# Altium PCB BLV.PcbDoc
Units mil, origin at the board's own origin, x right, y up, seen from the top; angles counter-clockwise.
Board outline 1968.5 x 1704.77 mil, 2 copper layers (Top Layer, Bottom Layer); 33 components, 31 nets, 109 pads, 102 vias.
Unrouted connection lines stored in the file: 28.
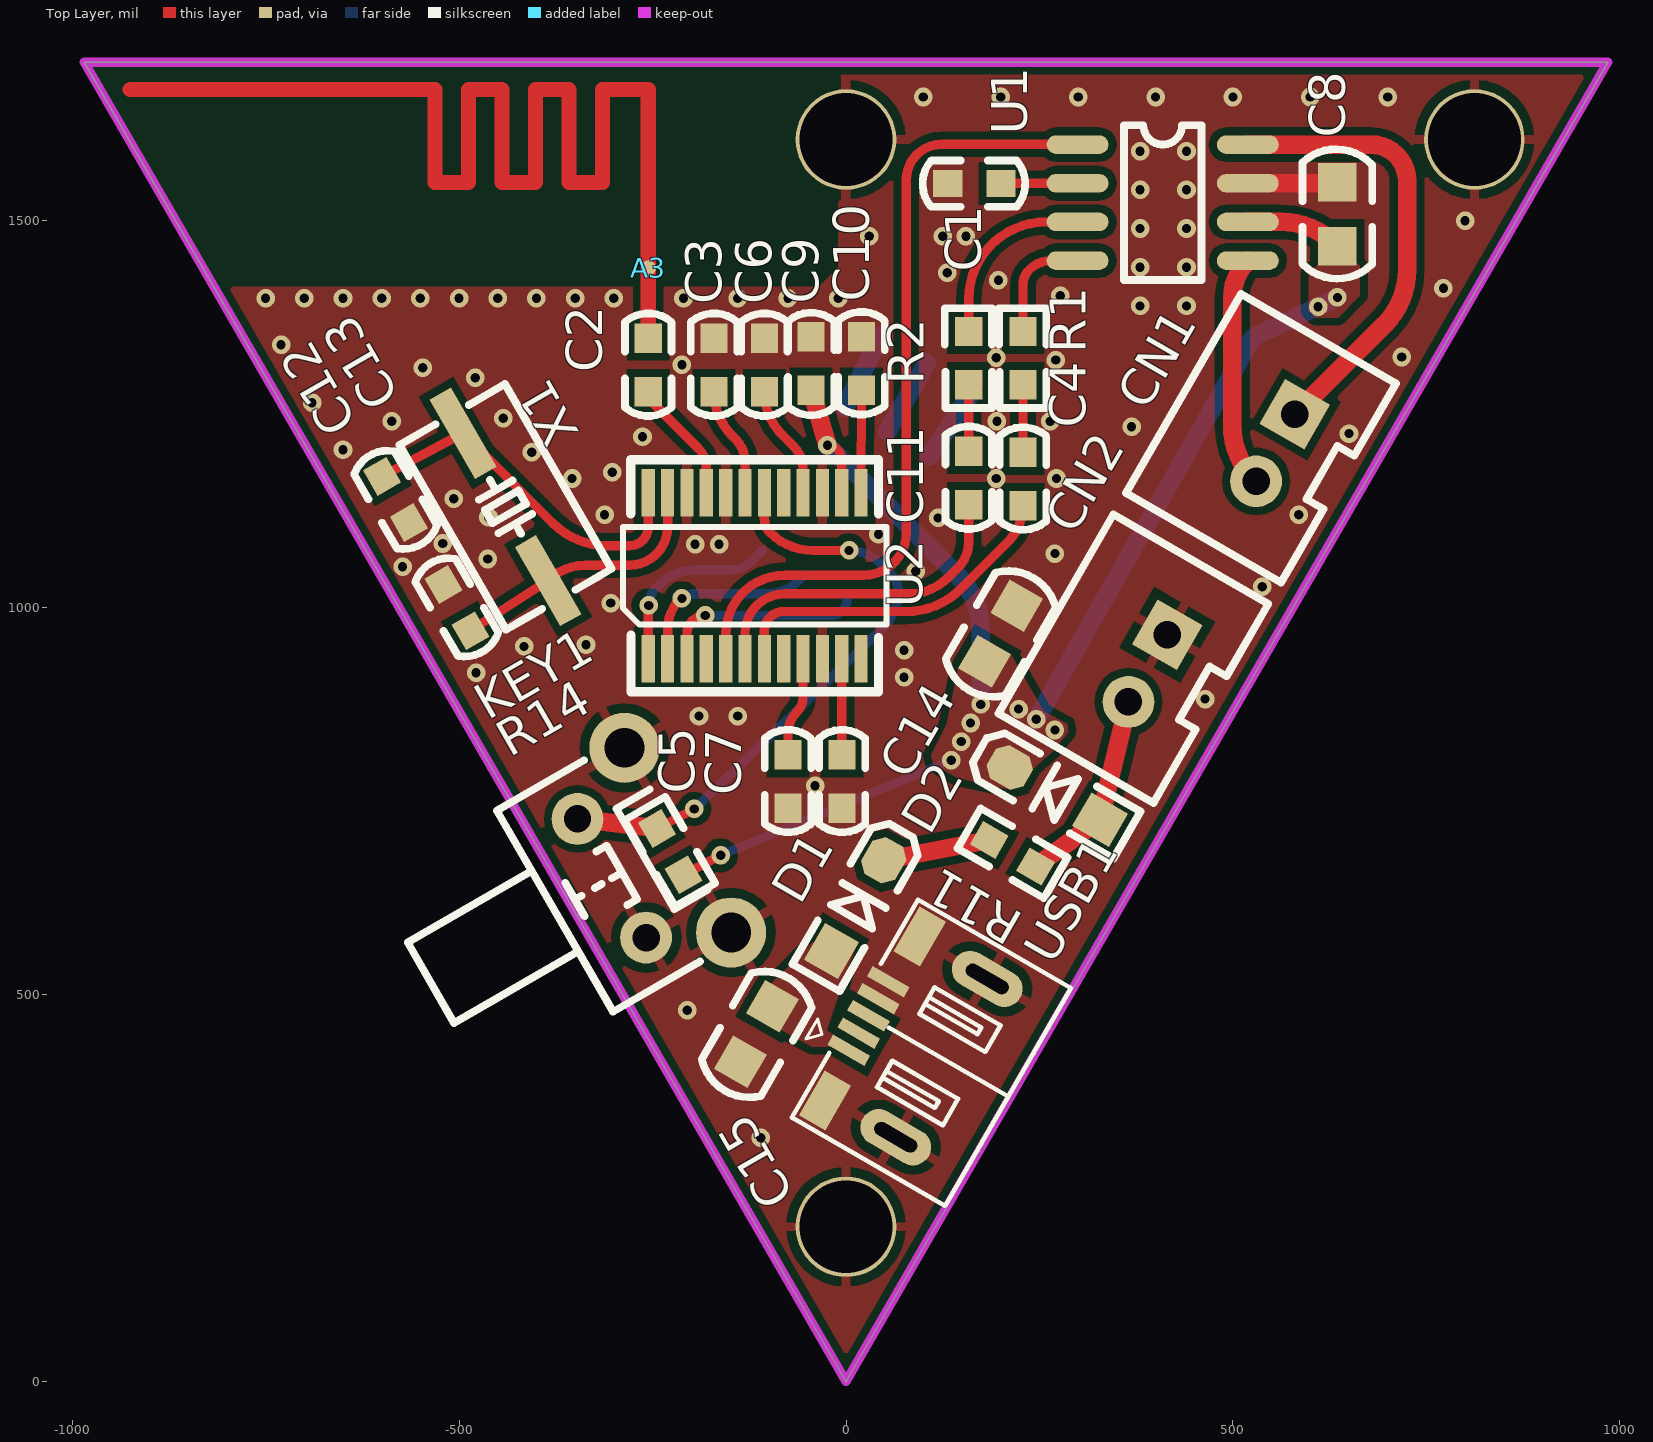
[diagram p0: Top Layer view]
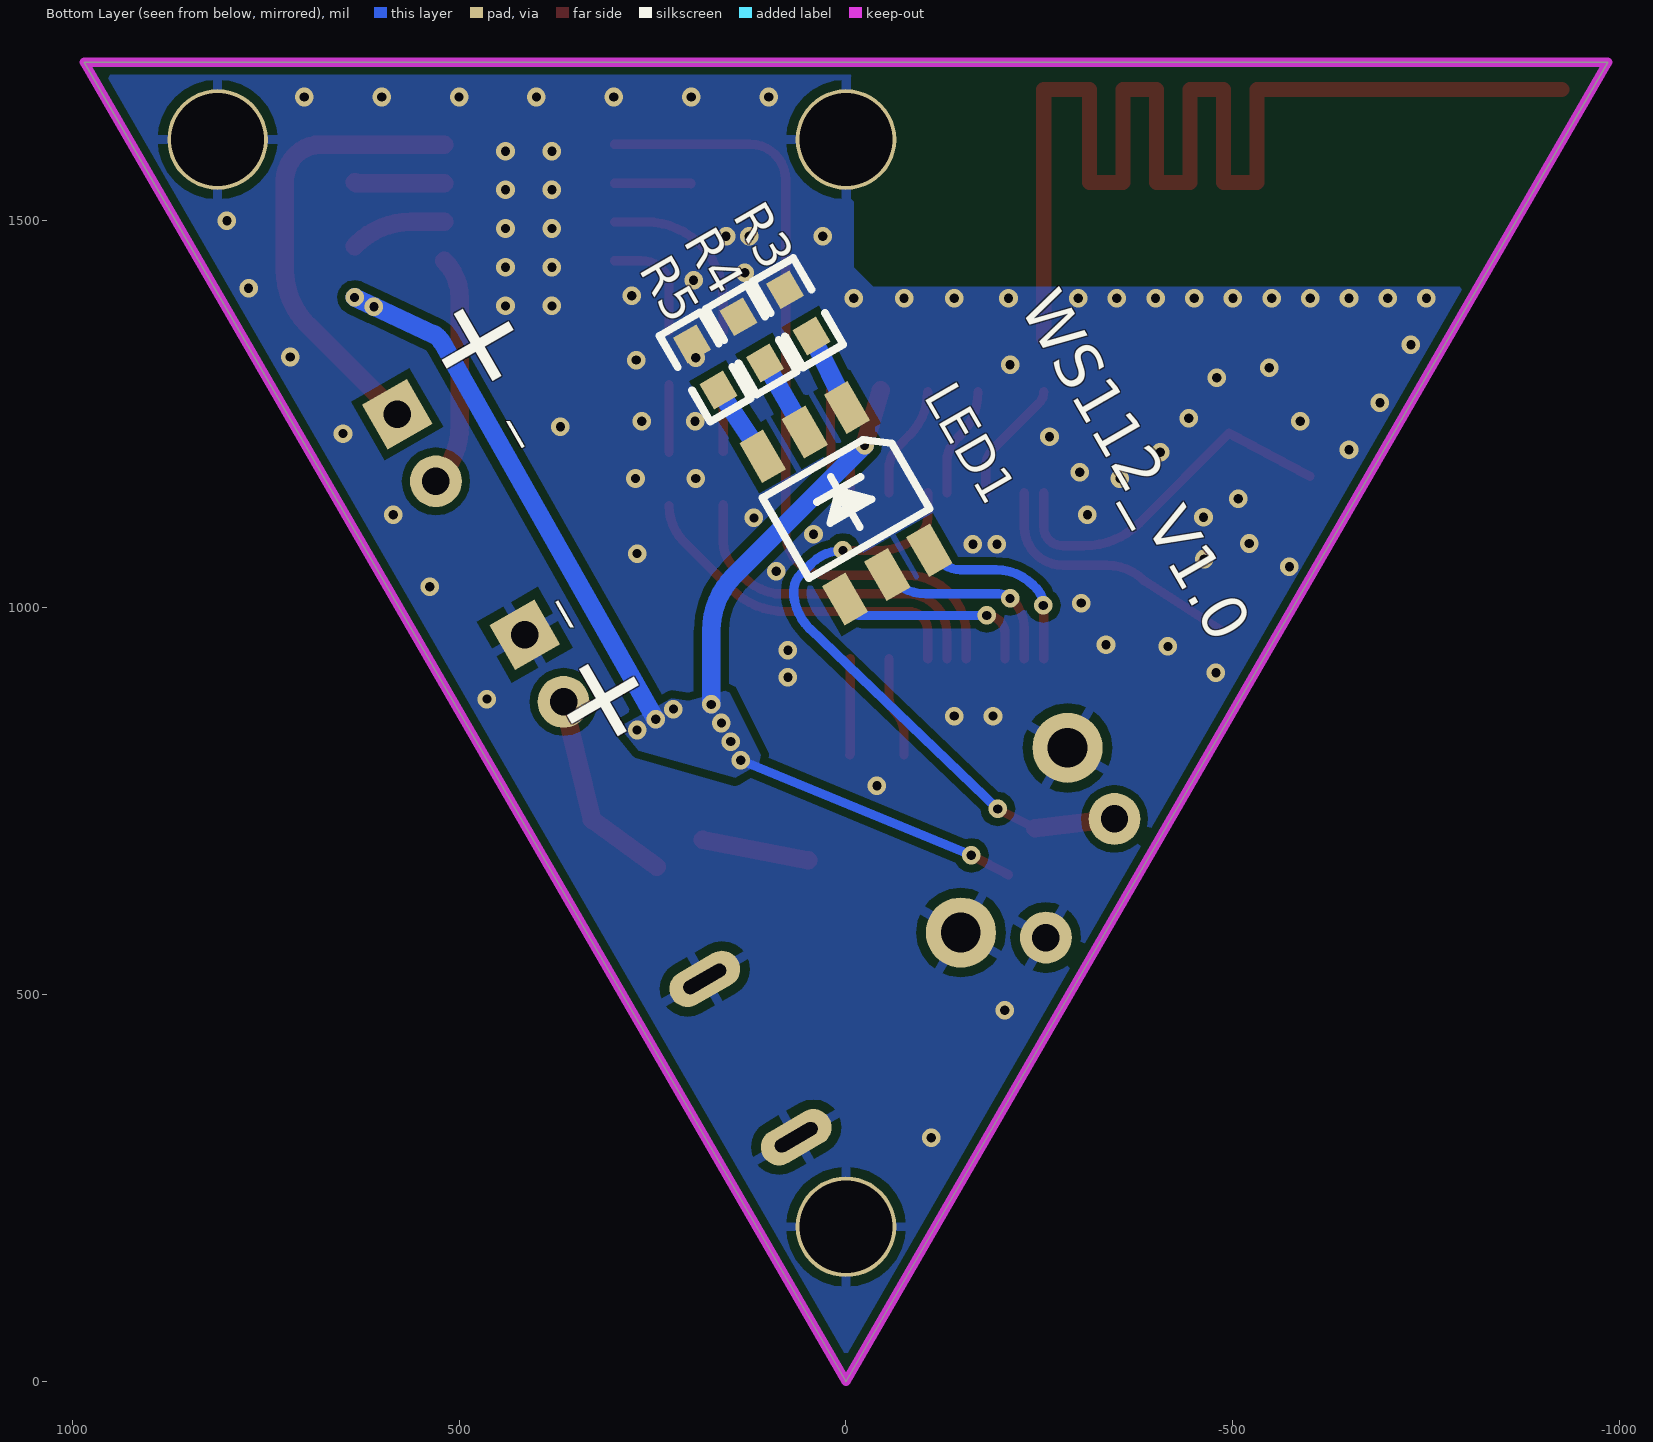
[diagram p1: Bottom Layer view, seen from below]
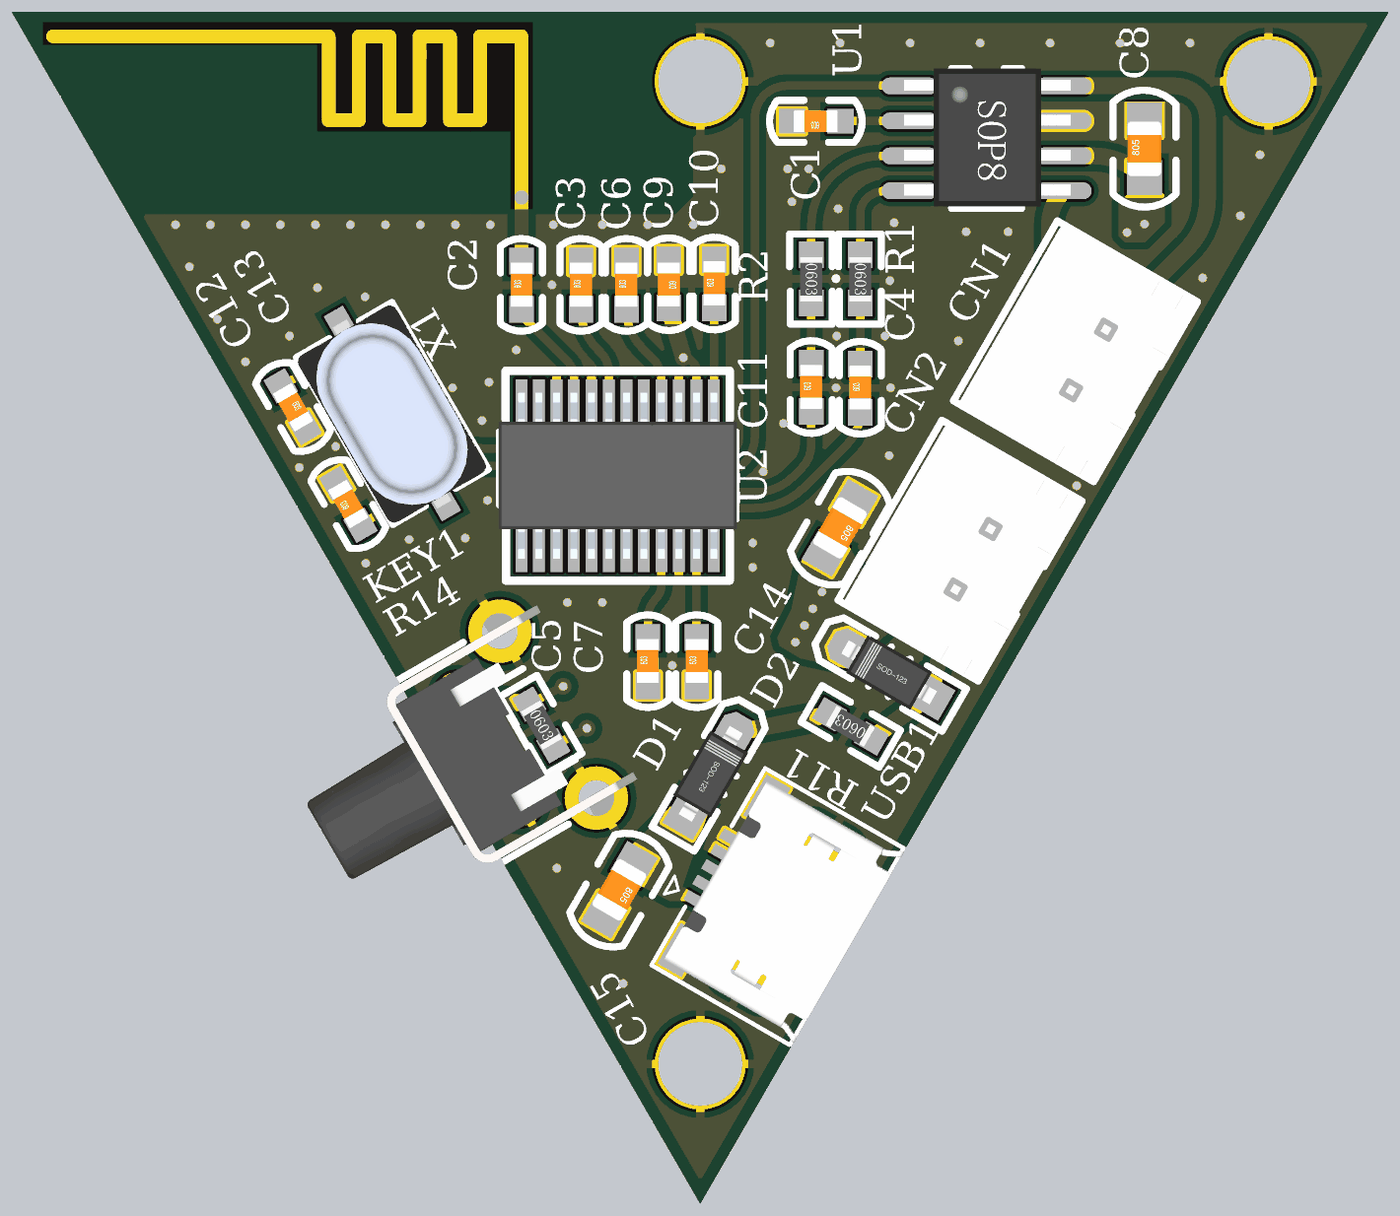
[diagram p2: 3D render of the assembled board from above, using the file's embedded part models]
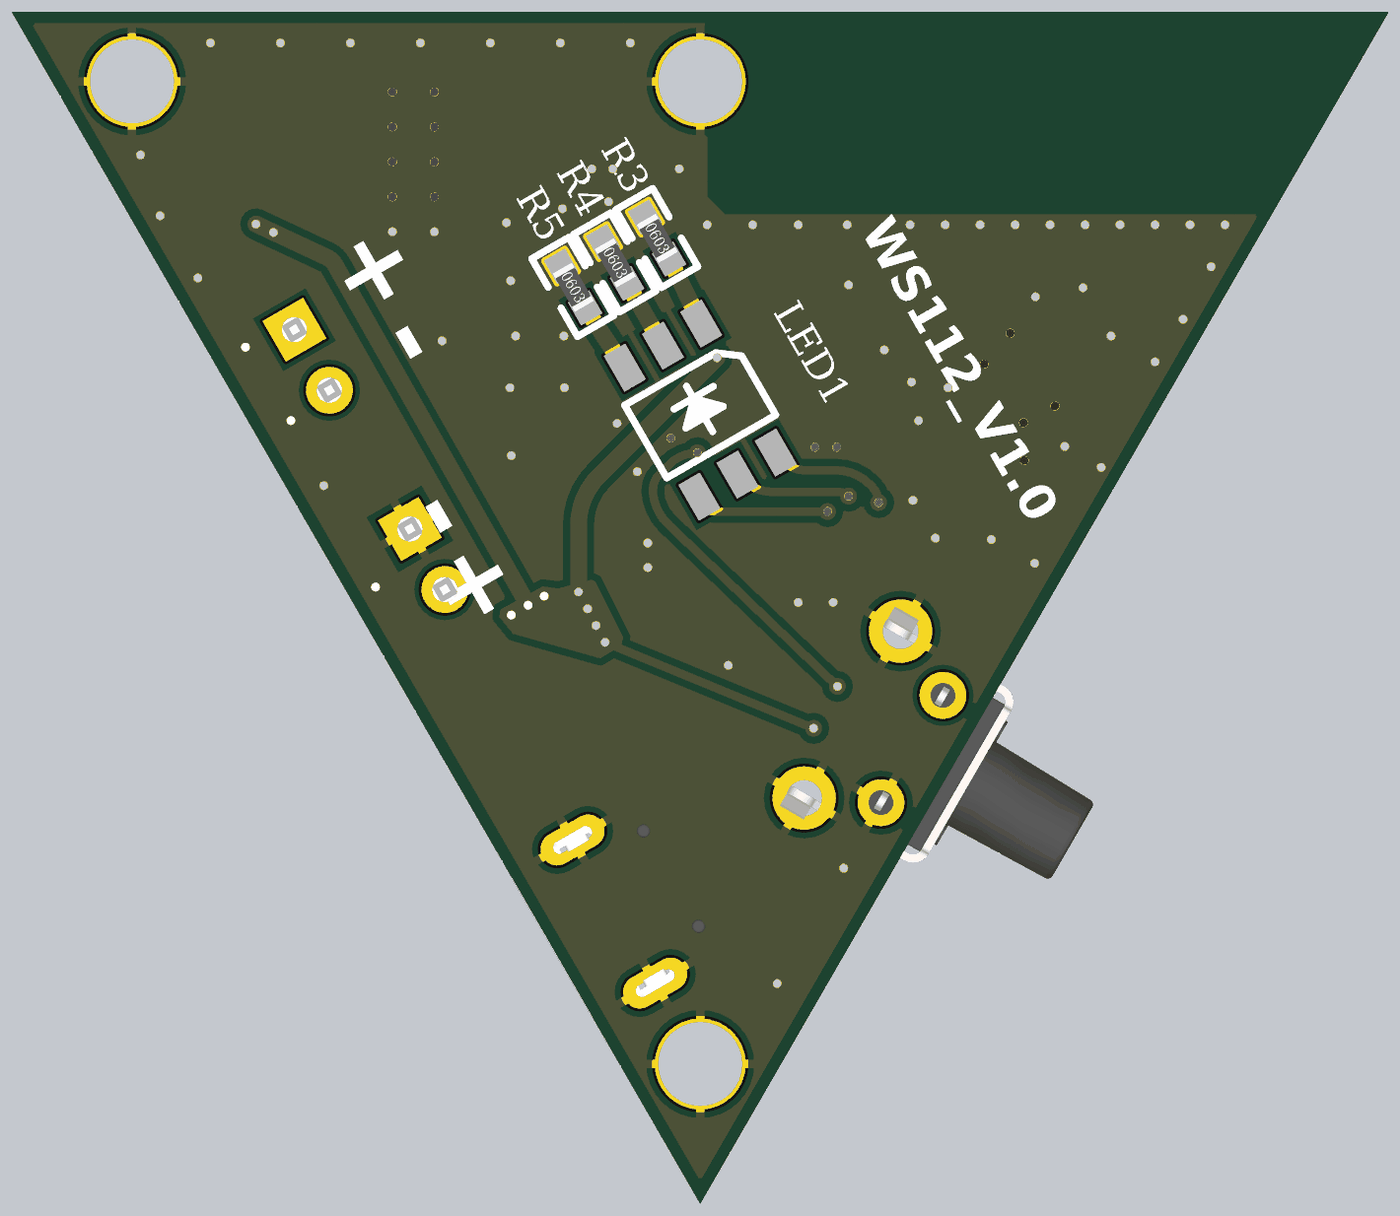
[diagram p3: 3D render of the assembled board from below, using the file's embedded part models]

## Layer stack, top to bottom
Top Solder: solder mask 0.4, Solder Resist, Dk 3.5
Top Layer: signal copper 1.4
Dielectric 1: dielectric 12.6, FR-4, Dk 4.8
Bottom Layer: signal copper 1.4
Bottom Solder: solder mask 0.4, Solder Resist, Dk 3.5

## Board outline
-984.25,1704.77 984.25,1704.77 0,0

## Design rules (kind name [scope] priority, off if disabled: settings)
AssemblyTestPointUsage [All] p1 off:
AssemblyTestpoint [All] p1 off: testpointundercomponent=TRUE minsize=40 maxsize=100 preferedsize=60 minholesize=0 maxholesize=40 preferedholesize=32 testpointgrid=1 usegrid=TRUE gridtolerance=0.01 allowsidetop=TRUE allowsidebottom=TRUE
Clearance [All] p1: gap=10 ignorepadtopadclearanceinfootprint=TRUE except(0: Arc-Text Arc-Hole Track-Text Track-Hole SMDPad-Text SMDPad-Hole THPad-Text THPad-Hole Via-Text Via-Hole Fill-Text Fill-Hole Poly-Text Poly-Hole Region-Text Region-Hole Text-Text Text-Hole)
FabricationTestPointUsage [All] p1 off: valid=0 allowmultiple=FALSE
FabricationTestpoint [All] p1 off: side=3 testpointundercomponent=TRUE minsize=40 maxsize=100 preferedsize=60 minholesize=0 maxholesize=40 preferedholesize=32 testpointgrid=1 allowsidetop=TRUE allowsidebottom=TRUE usegrid=TRUE gridtolerance=0.01
HoleSize [All] p1: absolutevalues=TRUE maxlimit=10000 minlimit=1 maxpercent=80.000 minpercent=20.000
LayerPairs [All] p1 off: enforce=TRUE
MinimumSolderMaskSliver [All] p1 off: minsoldermaskwidth=10
PasteMaskExpansion [All] p1 off: expansion=0
PlaneConnect [All] p1: pad.planeconnectstyle=Relief pad.reliefexpansion=20 pad.reliefentries=4 pad.reliefconductorwidth=10 pad.reliefairgap=10 via.planeconnectstyle=Direct via.reliefexpansion=20 via.reliefentries=4 via.reliefconductorwidth=10 via.reliefairgap=10
PolygonConnect [All] p1: thpad.connectstyle=Relief thpad.reliefconductorwidth=12 thpad.reliefentries=4 thpad.polygonreliefangle="90 Angle" thpad.airgapwidth=12 smdpad.connectstyle=Direct smdpad.reliefconductorwidth=10 smdpad.reliefentries=4 smdpad.polygonreliefangle="90 Angle" smdpad.airgapwidth=10 via.connectstyle=Direct via.reliefconductorwidth=10 via.reliefentries=4 via.polygonreliefangle="90 Angle" via.airgapwidth=10
RoutingVias [All] p1: holewidth=12 width=24 viastyle="Through Hole" minholewidth=8 minwidth=12 maxholewidth=24 maxwidth=48
SilkToSilkClearance [All] p1 off: silktosilkclearance=6
SilkToSolderMaskClearance [IsPad] p1 off: minsilkscreentomaskgap=10 clearancetoexposedcopper=TRUE
SolderMaskExpansion [All] p1 off: expansion=4 istentingtop=FALSE
Width [All] p1: maxlimit=300 minlimit=10 preferedwidth=12
19 further rules are at their usual default settings.

## Components (designator, comment, footprint, x,y, rotation, side; value= is the part's Value field where it differs from the comment)
A3 "2.4G天线" ANT-RF-BT6-2.4G -255.51,1439.06 r180 top
C1 "1u" C0603 200.25,1548.02 r180 top
C2 "10p" C0603 -255.51,1279.06 r90 top
C3 "1u" C0603 -170.51,1279.06 r90 top
C4 "10n" C0603 228.65,1131.99 r90 top
C5 "1u" C0603 -75,741 r90 top
C6 "1u" C0603 -105.51,1279.06 r90 top
C7 "560n" C0603 -5,741 r90 top
C8 "10u" C0805 634.9,1461.3 r90 top
C9 "10u" C0603 -45,1350 r270 top
C10 "10u" C0603 20,1281 r90 top
C11 "10n" C0603 158.65,1132.99 r90 top
C12 "10p" C0603 -485.5,970.24 r120 top
C13 "10p" C0603 -599.5,1169.76 r300 top
C14 "100n" C0805 223.44,1007.77 r240 top
C15 "10u" C0805 -92,490.2 r240 top
CN1 "XH2.54" XH2.54-LI-2P 555,1206.7 r240 top
CN2 "XH2.54" XH2.54-LI-2P 390,921.7 r240 top
D1 "T4" SOD-123 15,615 r60 top
D2 "S4" SOD-123 270,760 r150 top
KEY1 "DIP 6*6*8" "TSW DIP-6*6*8" -260,675 r120 top
LED1 "RGB" "LED 5050" 0,1135 r240 bottom
R1 "47k" R0603 228.65,1356.99 r270 top
R2 "47k" R0603 158.65,1356.99 r270 top
R3 "5k1" R0603 79,1411 r240 bottom
R4 "5k1" R0603 139,1376 r240 bottom
R5 "5k1" R0603 199,1341 r240 bottom
R11 "150" R0603 244.76,665.5 r150 top
R14 "47k" R0603 -244.5,714.76 r300 top
U1 "ANT8110S" SOP8 300.28,1599.53 r0 top
U2 "AS1711-5C4" QSOP24 -117.99,1041.34 r90 top
USB1 "U254-051T-4BH82-S2S" USB-MICRO_B 120,420 r60 top
X1 "24MHz" 49XSMD -495,1225.53 r300 top

## Footprints (in the part's own frame and the unit in brackets; to place one, negate y for a bottom-side part, rotate by r counter-clockwise, add the part's x,y. Pads: shape width x height; smd on the part's side, far side on the other; paste and mask are expansions set on the pad)
49XSMD [mm]
  rect 3x0.8 smd: 1(0,0) 2(5.588,0)
  silkscreen extent -0.71,-2 6.29,2, body extent -0.99,-2.07 6.61,2.03, height 2.31
ANT-RF-BT6-2.4G [mil]
  round 20 smd: 1(0,0)
  Top Layer lines w19.68: 669.29,-230.46 275.59,-230.46 275.59,-110.38 232.28,-110.38 232.28,-230.46 188.98,-230.46 188.98,-110.38 145.67,-110.38 145.67,-230.46 102.36,-230.46 102.36,-110.38 59.05,-110.38 59.06,-230.46 0,-230.46 0,0
C0603 [mil]
  rect 38x35 smd: 1(0,0) 2(69,0)
  silkscreen extent -31,-30 101,30, body extent 4,-16 67,16, height 12
C0805 [mil]
  rect 50x50 smd: 1(6,0) 2(88.7,-0.1)
  silkscreen extent -36,-45 131,45, body extent 8,-25 87,25, height 30
"LED 5050" [mm] "白色5050LED                                           淘宝ID:黄晶宝石"
  rect 1.5x0.9 smd: 1(-2.705,-1.6) 2(-2.705,0) 3(-2.705,1.6) 4(2.705,1.6) 5(2.705,0) 6(2.705,-1.6)
  silkscreen extent -1.52,-2.29 1.52,2.29, body extent -2.7,-2.5 2.7,2.5, height 1.65
QSOP24 [mm]
  rect 1.55x0.435 smd: 1(-2.725,3.492) 2(-2.725,2.858) 3(-2.725,2.222) 4(-2.725,1.588) 5(-2.725,0.952) 6(-2.725,0.318) 7(-2.725,-0.318) 8(-2.725,-0.952) 9(-2.725,-1.588) 10(-2.725,-2.222) 11(-2.725,-2.858) 12(-2.725,-3.492) 13(2.725,-3.492) 14(2.725,-2.858) 15(2.725,-2.222) 16(2.725,-1.588) 17(2.725,-0.952) 18(2.725,-0.318) 19(2.725,0.318) 20(2.725,0.952) 21(2.725,1.588) 22(2.725,2.222) 23(2.725,2.858) 24(2.725,3.492)
  silkscreen extent -3.81,-4.33 3.81,4.33, body extent -3.01,-4.33 3.01,4.32, height 1.75
R0603 [mil] "1/10W"
  rect 38x35 smd: 1(0,0) 2(69,0)
  silkscreen extent -30,-31 99,30, body extent 4,-16 66,16, height 18
SOD-123 [mil] "2.7x1.6X1.1mm（长宽高，不包括引脚）"
  oct 55x50 smd: 1(67.5,0)
  rect 55x50 smd: 2(-67.5,0)
  silkscreen extent -107,-35 112,35, body extent -73,-31 73,31, height 48
SOP8 [mil]
  oval 80x24 smd: 1(-1,-1) 2(-1,-51) 3(-1,-101) 4(-1,-151) 5(219,-151) 6(219,-101) 7(219,-51) 8(219,-1)
  silkscreen extent 59,-176 159,24, body extent -9,-174 229,24, height 63
"TSW DIP-6*6*8" [mm] "6*6*6mm"
  round 1.7 hole 0.9: 1(2.25,1.25) 2(-2.25,1.25)
  round 2.3 hole 1.3: 3(-3.5,-1.25) 4(3.5,-1.25)
  silkscreen extent -3.81,-1.29 3.81,8.11, body extent -4.18,-2.88 4.18,7.97, height 7.48
USB-MICRO_B [mm] "micro型USB ，5.9*8.2*2.5mm"
  rect 0.394x1.4 smd: 1(-1.295,2.667) 4(0.648,2.667) 5(1.295,2.667)
  rect 0.394x1.4 smd mask+0.102: 2(-0.648,2.667) 3(0,2.667)
  rect 1.7x1 smd: 6(3.099,2.515) 9(-3.124,2.515)
  oval 1.2x2.5 hole 0.45 slot 1.55 at 90 deg: 7(3,-0.1) 8(-3,-0.1)
  silkscreen extent -4.14,-2.63 4.11,4.06, body extent -4,-2.72 4,2.88, height 2.8
XH2.54-LI-2P [mm] "接插件，2P"
  rect 1.7x1.7 hole 0.9: 1(-1.27,0)
  round 1.7 hole 0.9: 2(1.27,0)
  silkscreen extent -3.81,-3.51 3.74,2.37, body extent -3.77,-3.3 3.77,2.4, height 7.05

## Part data
A3: BOM_Manufacturer Part="New SchematicLib", Contributor=suanm, spicePre=U, spiceSymbolName=2.4G天线_右
C4 C11: library part 22n, Contributor=LCEDA_Lib, nameAlias=Value(F), spicePre=C, spiceSymbolName=C_0603_US
CN1 CN2: BOM_JLCPCB Part Class="Extended Part", BOM_Manufacturer=null, BOM_Manufacturer Part=CONN-TH_XH-2A, BOM_Supplier=LCSC, BOM_Supplier Part=C9900010848, Contributor=LCSC, spicePre=C, spiceSymbolName=CONN-TH_XH-2A_C9900010848
D1 D2: BOM_JLCPCB Part Class="Extended Part", BOM_Manufacturer=CJ, BOM_Manufacturer Part="1N4148W T4", BOM_Supplier=LCSC, BOM_Supplier Part=C2099, Contributor=立创EDA官方封装库, spicePre=D, spiceSymbolName="1N4148W T4"
KEY1: BOM_JLCPCB Part Class="Extended Part", BOM_Manufacturer=韩国韩荣, BOM_Manufacturer Part=K2-1102AQ-H4CW-01, BOM_Supplier=LCSC, BOM_Supplier Part=C961738, Contributor=LCSC, spicePre=S, spiceSymbolName=K2-1102AQ-H4CW-01
LED1: BOM_JLCPCB Part Class="Extended Part", BOM_Manufacturer="Hongli Zhihui (HONGLITRONIC)", BOM_Manufacturer Part=HL-AF-5060H271BU46FU79GC-S1-THL, BOM_Supplier=LCSC, BOM_Supplier Part=C219409, Contributor=LCSC, spicePre=L, spiceSymbolName=HL-AF-5060H271BU46FU79GC-S1-THL
R1 R2: library part 22k, Contributor=LCEDA_Lib, nameAlias=Value(Ω), spicePre=R, spiceSymbolName=R_0603_EU
R14: library part 4k7, Contributor=LCEDA_Lib, nameAlias=Value(Ω), spicePre=R, spiceSymbolName=R_0603_EU
U1: BOM_JLCPCB Part Class="Extended Part", BOM_Manufacturer=null, BOM_Manufacturer Part=ANT8110S, BOM_Supplier=LCSC, BOM_Supplier Part=C9900000568, Contributor=LCSC, spicePre=U, spiceSymbolName=ANT8110S
USB1: BOM_JLCPCB Part Class="Extended Part", BOM_Manufacturer="XKB Connectivity(中国星坤)", BOM_Manufacturer Part=U254-051T-4BH82-S2S, BOM_Supplier=LCSC, BOM_Supplier Part=C908456, Contributor=LCSC, spicePre=U, spiceSymbolName=U254-051T-4BH82-S2S
X1: BOM_JLCPCB Part Class="Extended Part", BOM_Manufacturer="Yangxing Tech", BOM_Manufacturer Part=X49XM24MOB2SC, BOM_Supplier=LCSC, BOM_Supplier Part=C412889, Contributor=LCSC, nameAlias=Frequency, spicePre=X, spiceSymbolName=X49XM24MOB2SC
C1 C8 C14 C15: Contributor=LCEDA_Lib, nameAlias=Value(F), spicePre=C, spiceSymbolName=C_0805_US
C2 C3 C5 C6 C7 C9 C10 C12 C13: Contributor=LCEDA_Lib, nameAlias=Value(F), spicePre=C, spiceSymbolName=C_0603_US
R3 R4 R5 R11: Contributor=LCEDA_Lib, nameAlias=Value(Ω), spicePre=R, spiceSymbolName=R_0603_EU
U2: BOM_Supplier=JL杰理, Contributor=lekee085, spicePre=U, spiceSymbolName=AS1711-5C4

## Free pads (board coordinates)
  round 130 hole 120: 0(0,200) 0(0,1605) 0(812,1605)

## Via types
v1: diameter 24, hole 12, Top Layer to Bottom Layer, tented both sides, 102 vias

## Nets (pads, with @x,y where several pads share a name; then routed paths per layer and width w, separated by ;. In a path a pad name is that pad's centre, name@x,y a point inside that pad or via, vN(x,y) a via of type N, cw(c..) or ccw(c..) an arc to the next point about the centre after c; other vN are vias at no path point)
3.3V: C8.1 C9.2 C14.2 D2.1 R14.2 U1.6 U2.14 | length 1747.2
  Top Layer w12: R14.2 v1(-162,680) ; v1(-24,1210) cw(c-24,1191.47) -5.47,1191.47 U2.14
  Top Layer w24: C9.2 v1(-24,1210) ; U1.6 562.25,1498.53 cw(c562.25,1398.53) 632.96,1469.24 C8.1
  Bottom Layer w12: v1(-162,680) v1(136,803)
  Bottom Layer w24: v1(-24,1210) 144.71,1041.29 cw(c74,970.58) 174,970.58 v1(174,875) ; v1(246,856) 522.23,1343.34 cw(c543.1,1331.51) 532.96,1353.26 609.88,1389.25 v1(635,1401)
  other v1: 149,827 270,842 161,851 223,869 610,1389
GND: C1.2 C3.2 C5.1 C6.2 C7.1 C8.2 C9.1 C10.2 C12.2 C13.2 C14.1 C15.2 CN2.1 KEY1.2 KEY1.3 KEY1.4 pad.0 R3.1 R4.1 R5.1 U1.7 U2.10 U2.15 U2.20 U2.22 USB1.4 USB1.5 USB1.6 USB1.7 USB1.8 USB1.9 | length 116.1
  Top Layer w24: U1.7 631.46,1548.53 ccw(c631.46,1553.54) C8.2
  other v1: -110,315 -205,480 -40,770 -190,860 -140,860 464,882 75,910 -478,916 75,945 -416,950 -336,952 -304,1006 538,1027 90,1047 -573,1053 -463,1063 270,1070 -195,1082 -164,1082 -521,1083 42,1095 119,1116 -462,1117 -312,1120 585,1120 -507,1141 -354,1167 194,1167 272,1167 -302,1175 -406,1201 -650,1204 -263,1221 650,1225 369,1234 -587,1241 195,1241 264,1241 -443,1245 -690,1265 -479,1297 -547,1310 -212,1314 271,1320 194,1323 718,1324 -730,1340 380,1390 440,1390 -750,1400 -700,1400 -650,1400 -600,1400 -550,1400 -500,1400 -450,1400 -400,1400 -350,1400 -300,1400 -210,1400 -140,1400 -75,1400 -10,1400 277,1403 772,1413 197,1423 131,1433 380,1440 440,1440 30,1480 125,1480 155,1480 380,1490 440,1490 800,1500 380,1540 440,1540 380,1590 440,1590 100,1660 200,1660 300,1660 400,1660 500,1660 600,1660 700,1660
NetA3_1: A3.1 C2.2 | length 91
  Top Layer w19.68: C2.2 A3.1
NetC1_1: C1.1 U1.2 | length 99.2
  Top Layer w12: C1.1 cw(c201.48,1546.79) 201.48,1548.53 U1.2
NetC2_1: C2.1 U2.21 | length 159.2
  Top Layer w12: C2.1 ccw(c-234.86,1279.06) -249.46,1264.46 -190,1205 cw(c-212.92,1182.08) -180.51,1182.08 U2.21
NetC3_1: C3.1 U2.19 | length 141.8
  Top Layer w12: C3.1 ccw(c-89.5,1279.06) -146.78,1221.78 -142,1217 cw(c-169.75,1189.25) -130.51,1189.25 U2.19
NetC4_1: C4.1 U2.7 | length 450.2
  Top Layer w12: U2.7 -105.47,970.53 cw(c-81,970.53) -81,995 77.58,995 ccw(c77.58,1095) 148.29,1024.29 209.31,1085.31 ccw(c162.63,1131.99) C4.1
NetC4_2: C4.2 R1.2 | length 87
  Top Layer w12: C4.2 R1.2
NetC5_2: C5.2 U2.9 | length 129.3
  Top Layer w12: C5.2 -75,837.03 cw(c-34.03,837.03) -63,866 ccw(c-81.19,884.19) -55.47,884.19 U2.9
NetC6_1: C6.1 U2.16 | length 145.9
  Top Layer w12: C6.1 ccw(c-26.92,1279.06) -82.49,1223.49 -68,1209 cw(c-98.26,1178.74) -55.47,1178.74 U2.16
NetC7_2: C7.2 U2.11 | length 124.2
  Top Layer w12: U2.11 -5.47,811.12 ccw(c-3.88,811.12) C7.2
NetC10_1: C10.1 U2.13 | length 132.4
  Top Layer w12: U2.13 C10.1
NetC11_1: C11.1 U2.6 | length 433
  Top Layer w12: U2.6 -130.51,966.49 cw(c-79,966.49) -79,1018 89.02,1018 ccw(c89.02,1030) 91.05,1018.17 ccw(c77.58,1095) 132.71,1039.83 144.94,1052.06 ccw(c111.85,1085.15) 158.65,1085.15 C11.1
NetC11_2: C11.2 R2.2 | length 86
  Top Layer w12: C11.2 R2.2
NetC12_1: C12.1 U2.23 X1.2 | length 351.8
  Top Layer w12: C12.1 X1.2 cw(c-336.72,986.72) -336.72,1055 -280,1055 ccw(c-280,1104.49) -230.51,1104.49 U2.23
NetC13_1: C13.1 U2.24 X1.1 | length 472.1
  Top Layer w12: C13.1 X1.1 -378.76,1109.29 ccw(c-308.05,1180) -308.05,1080 -280,1080 ccw(c-280,1104.53) -255.47,1104.53 U2.24
NetCN1_1: CN1.1 U1.8 | length 590
  Top Layer w24: U1.8 678.47,1598.53 cw(c678.47,1552) 725,1552 725,1436.42 cw(c625,1436.42) 695.71,1365.71 CN1.1
NetCN1_2: CN1.2 U1.5 | length 299.1
  Top Layer w24: U1.5 ccw(c568.24,1399.57) 499,1399.57 499,1235.82 ccw(c599,1235.82) 528.29,1165.11 CN1.2
NetCN2_2: CN2.2 D2.2 R11.1 | length 259.9
  Top Layer w24: R11.1 D2.2 CN2.2
NetD1_1: D1.1 R11.2 | length 138.8
  Top Layer w24: D1.1 R11.2
NetKEY1_1: KEY1.1 R14.1 U2.18 | length 802.4
  Top Layer w12: R14.1 v1(-196,740) ; U2.18 -105.47,1115.02 ccw(c-79.98,1115.02) -98,1097 ccw(c-42.47,1152.53) -42.47,1074 v1(4,1074)
  Top Layer w24: KEY1.1 R14.1
  Bottom Layer w12: v1(-196,740) 47.06,972.93 ccw(c-3.49,1023.48) 67.55,1015.5 67.55,1021.91 ccw(c37.91,1021.91) 58.89,1042.85 44.53,1057.21 ccw(c4,1016.68) v1(4,1074) v1@1,1074
NetLED1_1: LED1.1 R5.2 | length 102.6
  Bottom Layer w24: LED1.1 R5.2
NetLED1_2: LED1.2 R4.2 | length 102.7
  Bottom Layer w24: LED1.2 R4.2
NetLED1_3: LED1.3 R3.2 | length 103.2
  Bottom Layer w24: LED1.3 R3.2
NetLED1_4: LED1.4 U2.1 | length 247.6
  Top Layer w12: U2.1 -255.47,1001.88 cw(c-253.88,1001.88) v1(-255,1003)
  Bottom Layer w12: v1(-255,1003) cw(c-223.62,1003) -245.81,1025.19 -242,1029 cw(c-193.72,980.72) -193.72,1049 -148,1049 ccw(c-148,1085.03) -122.53,1059.55 LED1.4
NetLED1_5: LED1.5 U2.2 | length 254.4
  Top Layer w12: U2.2 -230.51,972.15 cw(c-174.15,972.15) -214,1012 v1(-212,1012)
  Bottom Layer w12: v1@-214,1012 v1(-212,1012) cw(c-197.51,997.51) -197.51,1018 -103,1018 ccw(c-103,1078.31) -60.35,1035.66 LED1.5
NetLED1_6: LED1.6 U2.3 | length 264.8
  Top Layer w12: U2.3 -205.47,966.53 cw(c-182,966.53) v1(-182,990)
  Bottom Layer w12: v1(-182,990) -19.96,990 ccw(c-19.96,1011.27) LED1.6
NetR1_1: R1.1 U1.4 | length 148.1
  Top Layer w12: R1.1 228.65,1416.84 cw(c257.16,1416.84) 237,1437 cw(c264.84,1409.16) 264.84,1448.53 U1.4 U1.4@299.28,1448
NetR2_1: R2.1 U1.3 | length 239.2
  Top Layer w12: R2.1 158.65,1398.53 cw(c258.65,1398.53) 258.65,1498.53 U1.3
NetU1_1: U1.1 U2.5 | length 1044
  Top Layer w12: U2.5 -155.47,965.53 cw(c-79,965.53) -79,1042 23,1042 ccw(c23,1097) 78,1097 78,1553 cw(c124,1553) 124,1599 299.28,1599 U1.1
VIN: C15.1 D1.2 USB1.1
pads on no net: U2.4 U2.8 U2.12 U2.17 USB1.2 USB1.3

## Polygon pours and split planes (outlines as drawn)
GND on Top Layer "GND" (solid, remove dead copper, pour order 6): 0,0 984.25,1704.77 -10,1704.77 -10,1440 -35,1415 -815,1415
3.3V on Top Layer "3.3V" (solid, remove dead copper, pour order 3): 636,1375 664,1403 664,1442 660,1446 612,1446 598,1432 598,1384 607,1375
3.3V on Top Layer "3.3V" (solid, remove dead copper, pour order 2): 145,922 130,850 110,810 113,798 143,780 212,765 267.57,815.16 287.23,839.36 285.74,849.82 255.37,866.41 213,940
VIN on Top Layer "VIN" (solid, remove dead copper, pour order 0): -44,433 -95.5,460.5 -123,488 -43,568 15,568 0.5,529 -25.08,453.82 -21,452 -13,446 -20,439 -20,433
GND on Bottom Layer "GND" (solid, remove dead copper, pour order 5): 0,0 984.25,1704.77 -10,1704.77 -10,1440 -35,1415 -815,1415
3.3V on Bottom Layer "3.3V" (solid, remove dead copper, pour order 4): 143,780 267.57,815.16 287.23,839.36 285.74,849.82 225,883 203,880 156,892.5 150,890 110,810 113,798

## Keep-outs
Keep-Out Layer:
  the board outline again, w12

## Silkscreen, mask and mechanical layers (free items; w line width, h text height)
Bottom Overlay:
  text "WS112_V1.0" at -206.92,1379.52 h100 r60
  text "+" at 518.71,1237.26 h200 r60
  text "-" at 479.83,1161.7 h200 r60
  text "-" at 310.17,1053.3 h200 r240
  text "+" at 271.29,982.74 h200 r240
Mechanical 15:
  lines w12: -984.25,1704.77 747.8,704.77 ; 0,0 0,2000